# Altium PCB Plytka_power.PcbDoc
Units mm, origin at the board's own origin, x right, y up, seen from the top; angles counter-clockwise.
Board outline 49 x 49 mm, 2 copper layers (Top Layer, Bottom Layer); 26 components, 17 nets, 71 pads, 50 vias.
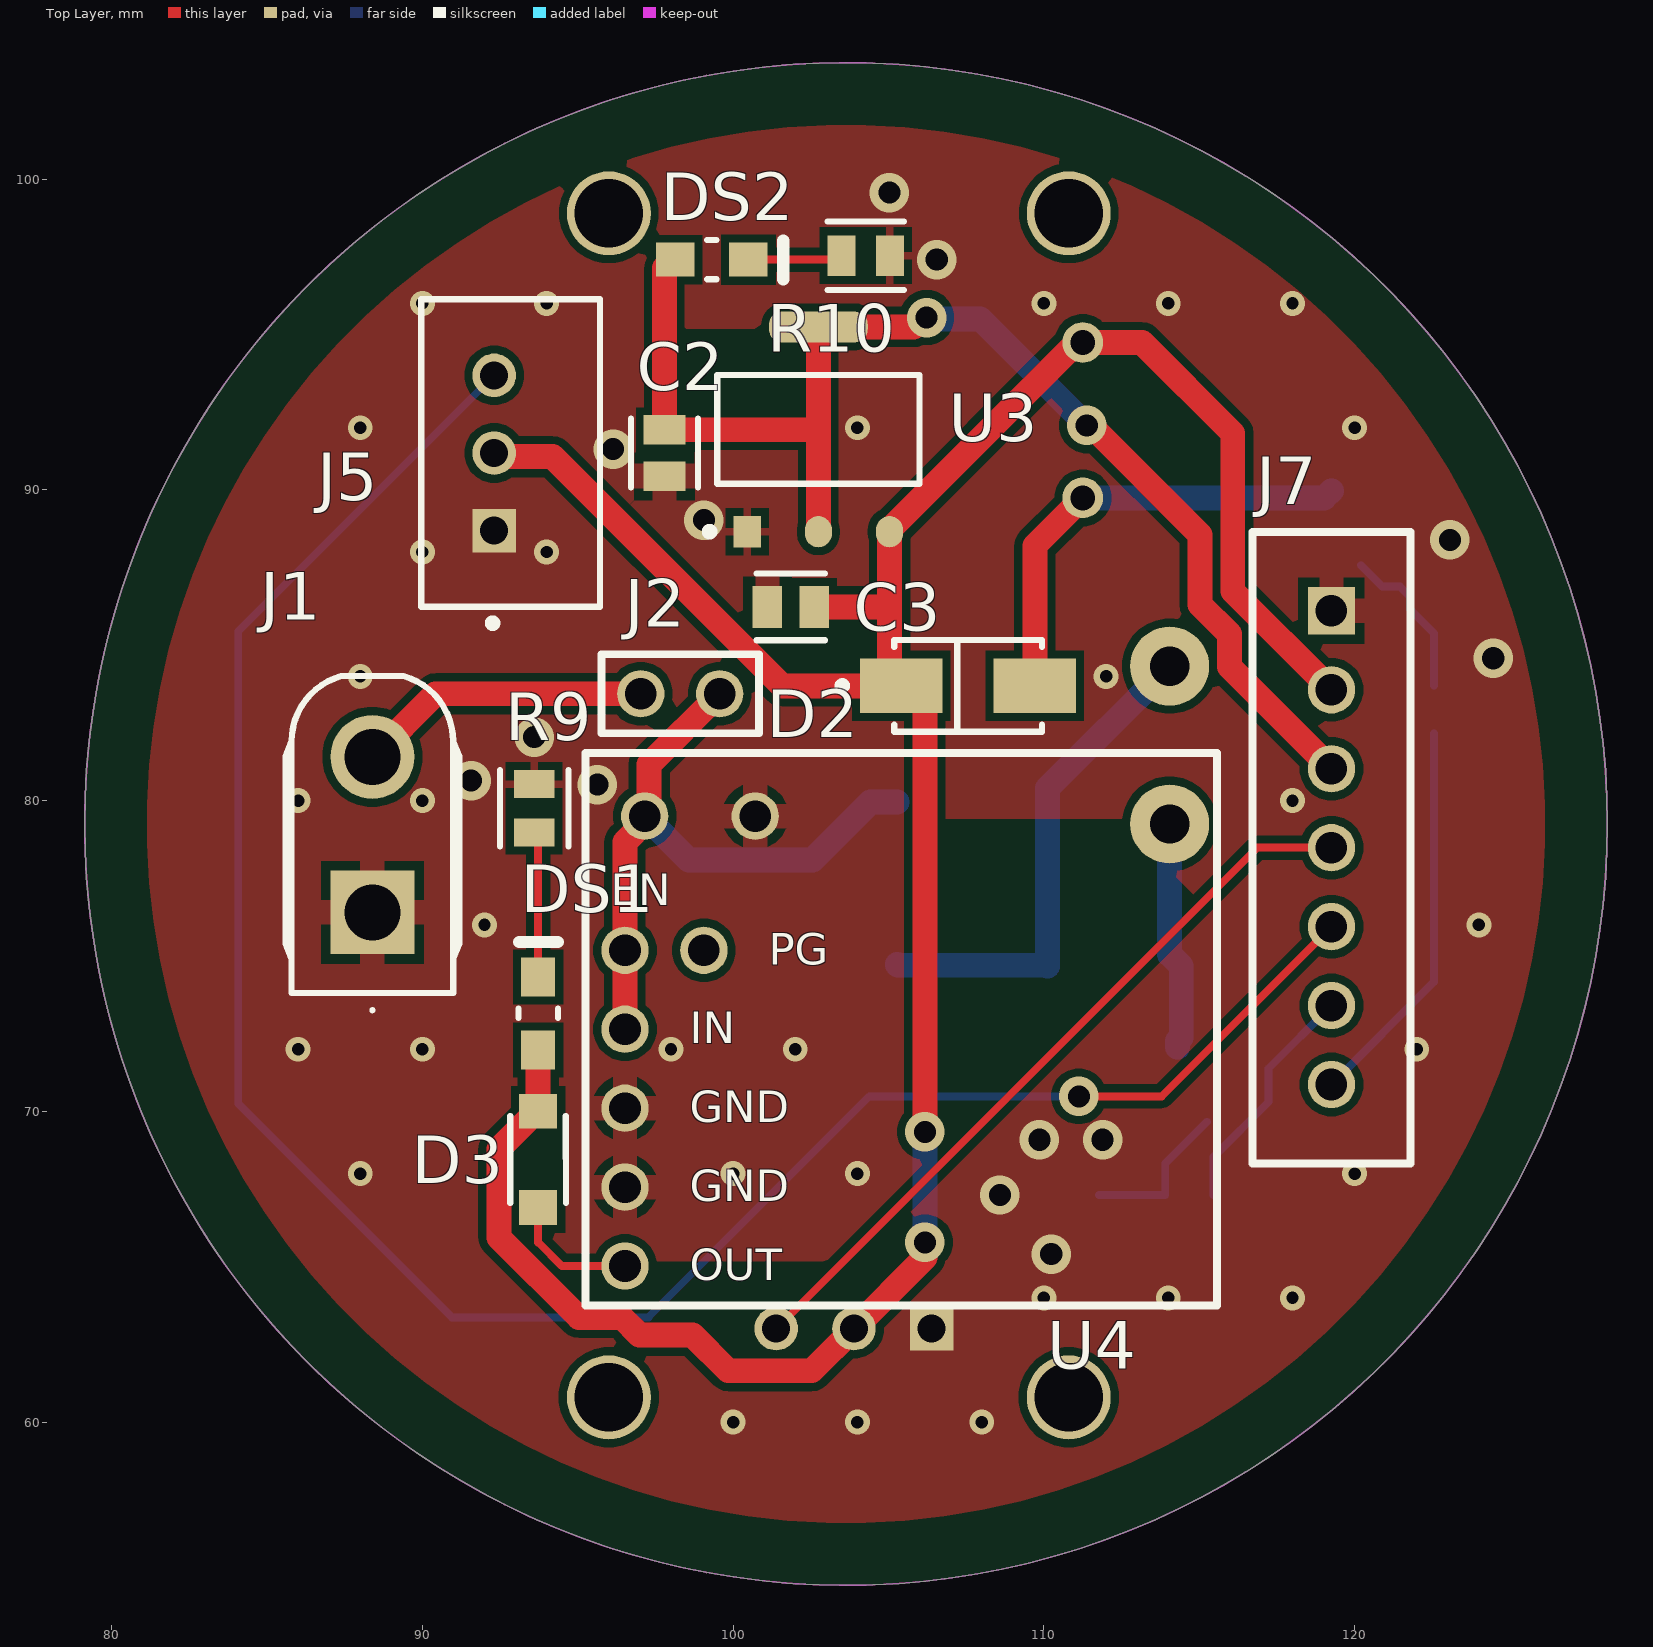
[diagram p0: Top Layer view]
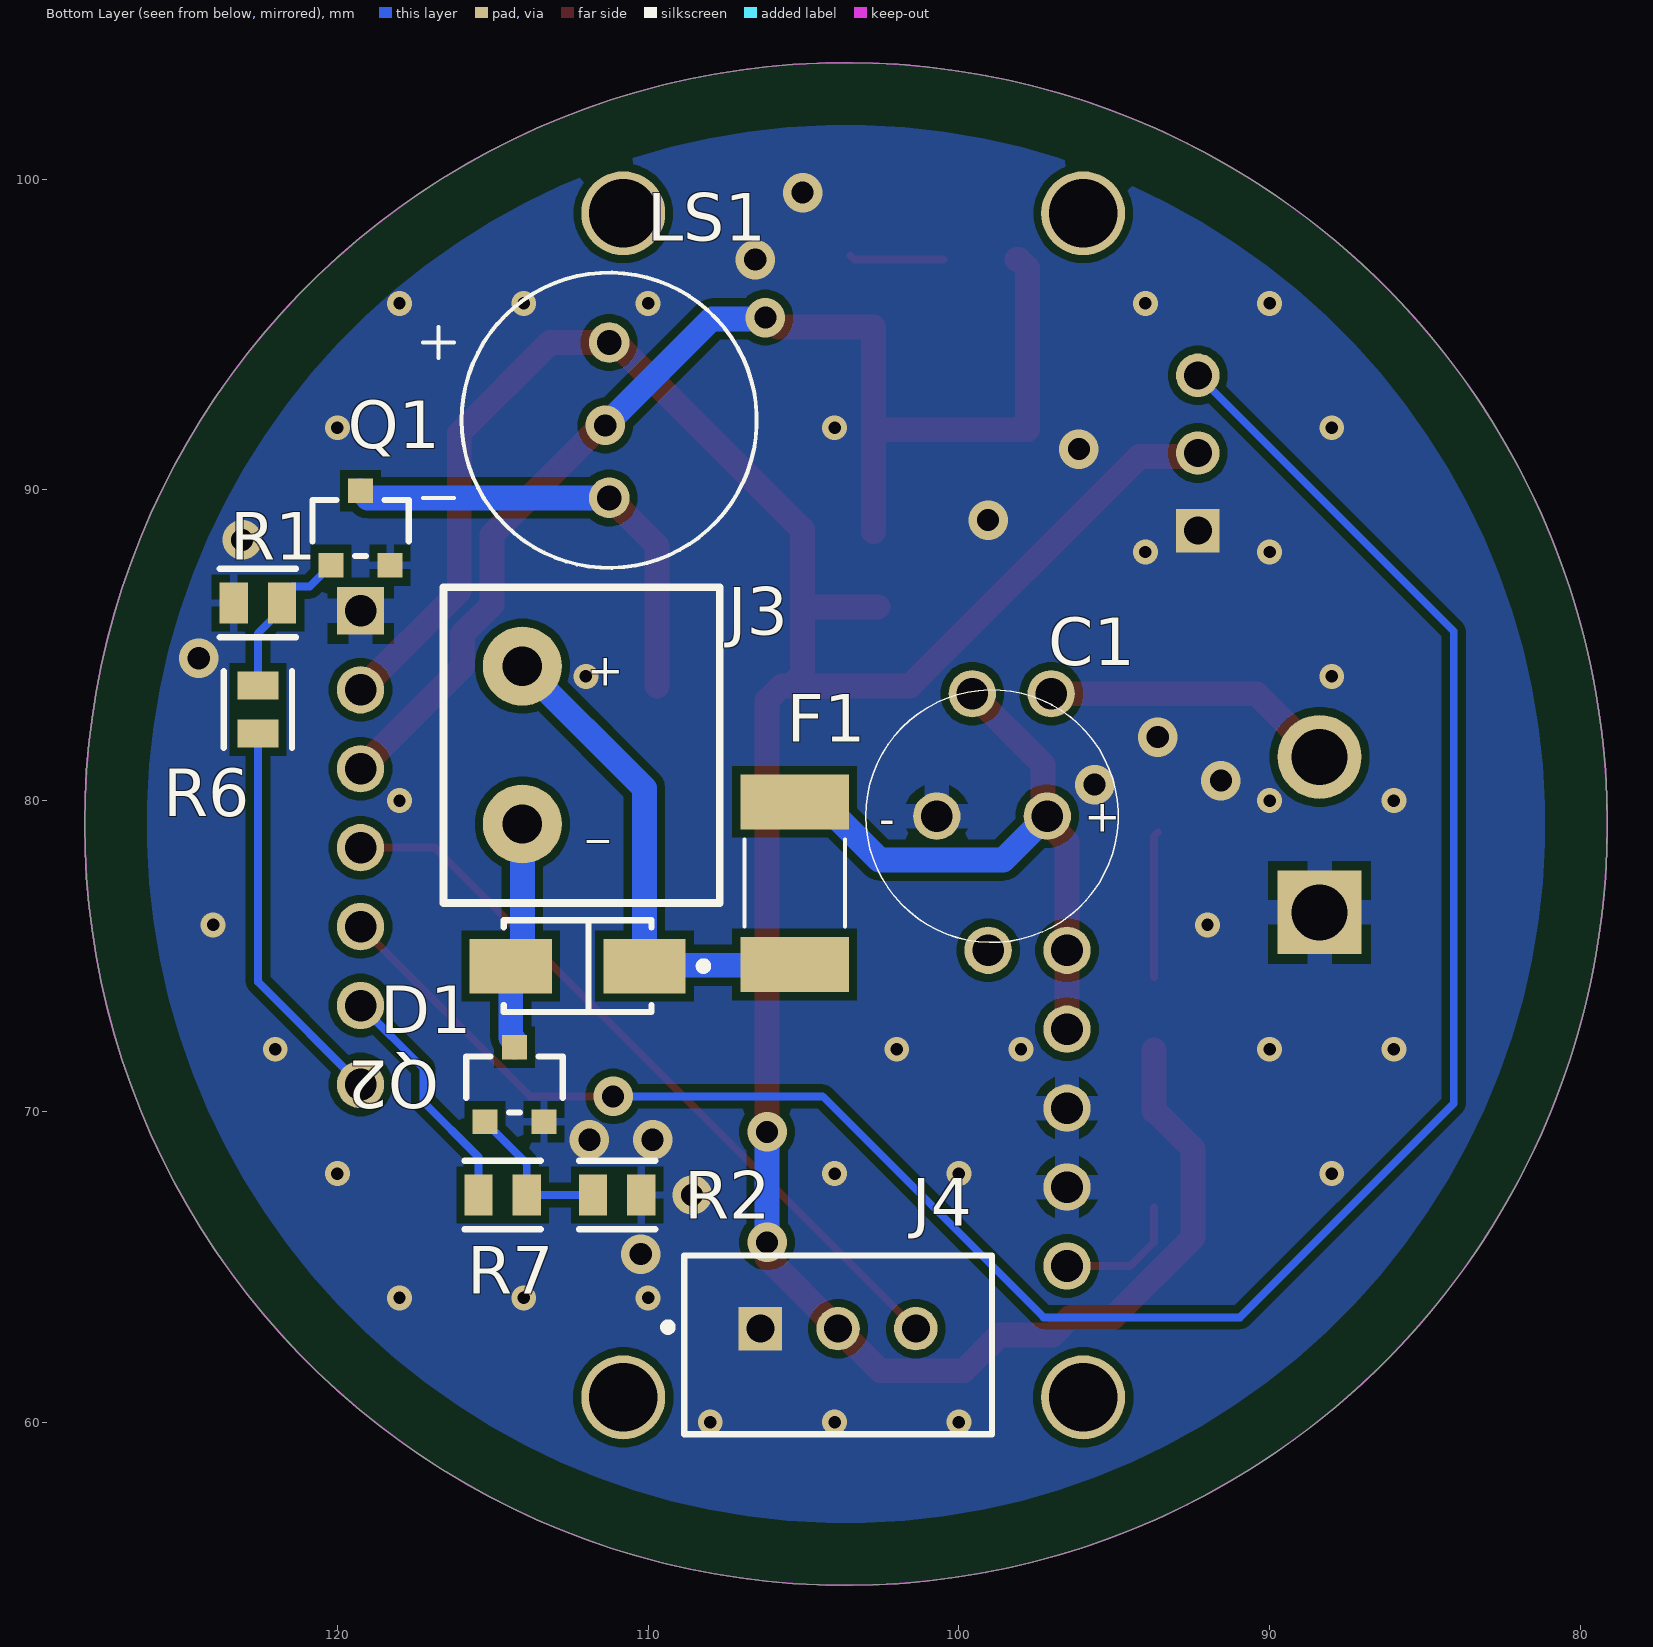
[diagram p1: Bottom Layer view, seen from below]
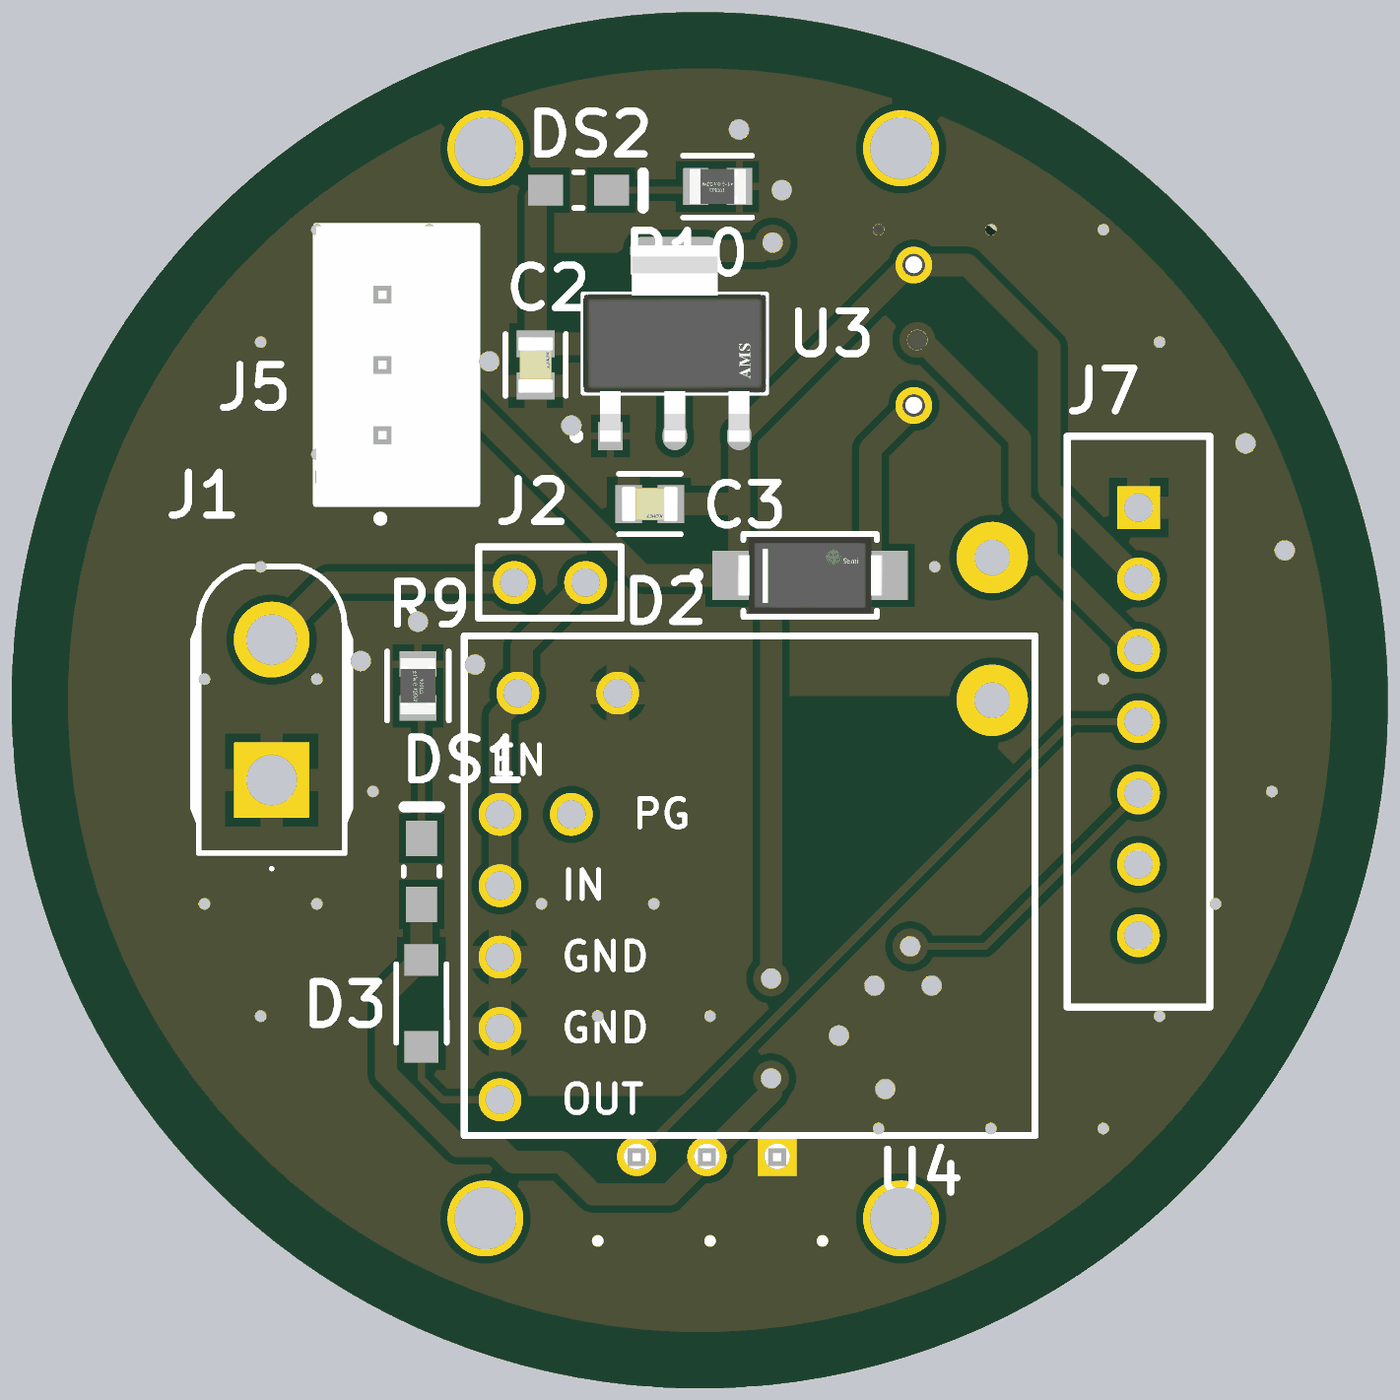
[diagram p2: 3D render of the assembled board from above, using the file's embedded part models]
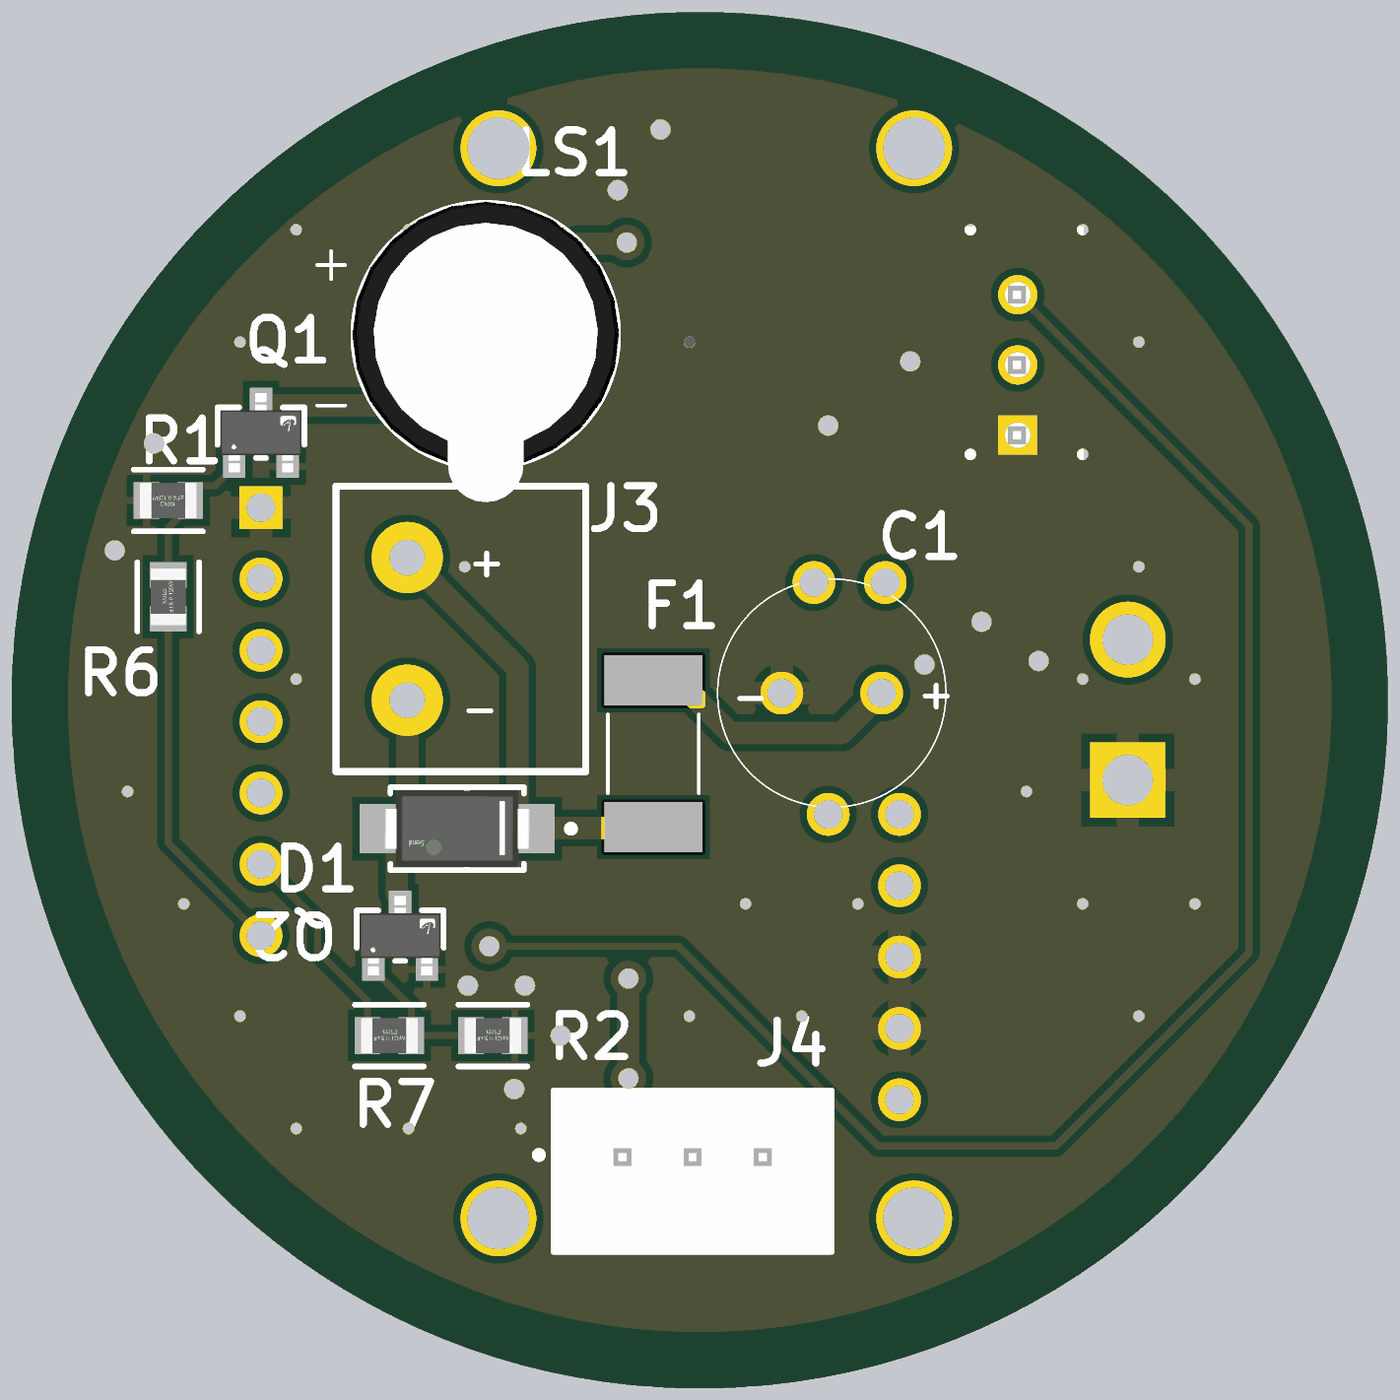
[diagram p3: 3D render of the assembled board from below, using the file's embedded part models]

## Layer stack, top to bottom
Top Solder: solder mask 0.0102, Solder Resist, Dk 3.5
Top Layer: signal copper 0.0356
Dielectric 1: dielectric 0.32, FR-4, Dk 4.8
Bottom Layer: signal copper 0.0356
Bottom Solder: solder mask 0.0102, Solder Resist, Dk 3.5

## Board outline
79.132,79.248 ccw(c103.632,79.248) 103.632,54.748 ccw(c103.632,79.248) 128.132,79.248 ccw(c103.632,79.248) 103.632,103.748 ccw(c103.632,79.248)

## Design rules (kind name [scope] priority, off if disabled: settings)
BoardOutlineClearance [All] p1: gap=2 ignorepadtopadclearanceinfootprint=FALSE except(0: Text-OutlineEdge Text-CavityEdge Text-CutoutEdge Text-SplitBarrior Text-SplitContinuation; 0.5: Arc-OutlineEdge Arc-CavityEdge Arc-CutoutEdge Arc-SplitBarrior Arc-SplitContinuation Track-OutlineEdge Track-CavityEdge Track-CutoutEdge Track-SplitBarrior Track-SplitContinuation)
Clearance [All] p1: gap=0.254 ignorepadtopadclearanceinfootprint=FALSE
PolygonConnect DirectConnect_Serwa [(InComponent('J5') or InComponent('J4')) and InNet('GND')] p1: connectstyle=Direct reliefconductorwidth=0.254 reliefentries=4 polygonreliefangle="90 Angle" airgapwidth=0.254
PolygonConnect PolygonConnect_J1 [All vs InComponent('J1') or InComponent('U4') or InComponent('J4') or InComponent('J5') or InComponent('C1') or InComponent('C2') or InComponent('C3') or InComponent('J7')] p2: connectstyle=Relief reliefconductorwidth=0.8 reliefentries=4 polygonreliefangle="90 Angle" airgapwidth=0.3
PolygonConnect Relief_U4_Przetwornica [InComponent('U4') and InNet('GND')] p3: connectstyle=Relief reliefconductorwidth=0.6 reliefentries=4 polygonreliefangle="90 Angle" airgapwidth=0.254
PolygonConnect [All] p4: thpad.connectstyle=Relief thpad.reliefconductorwidth=0.254 thpad.reliefentries=4 thpad.polygonreliefangle="90 Angle" thpad.airgapwidth=0.254 smdpad.connectstyle=Relief smdpad.reliefconductorwidth=0.254 smdpad.reliefentries=4 smdpad.polygonreliefangle="90 Angle" smdpad.airgapwidth=0.254 via.connectstyle=Direct via.reliefconductorwidth=0.254 via.reliefentries=4 via.polygonreliefangle="90 Angle" via.airgapwidth=0.254
RoutingVias [All] p1: holewidth=0.4 width=0.8 viastyle="Through Hole" minholewidth=0.2 minwidth=0.45 maxholewidth=0.8 maxwidth=1.5
SolderMaskExpansion SolderMask_Vias_Tented [IsVia] p1: expansion=0 istentingtop=TRUE
SolderMaskExpansion SolderMaskExpansion_1 [All] p2: expansion=0 istentingtop=FALSE
SupplyNets "Schematic Supply Nets" [InNet('GND')] p1: voltage=0.000
Width [InNet('VCC') or InNet('+5V') or InNet('+3.3V') or InNet('NetJ1_2') or InNet('NetD1_2') or InNet('NetJ3_1') or InNet('NetD1_1') or InNet('NetD2_1')] p1: maxlimit=1.2 minlimit=0.6 preferedwidth=0.8
Width Width_1 [All] p2: maxlimit=0.5 minlimit=0.2 preferedwidth=0.3
30 further rules are at their usual default settings.

## Components (designator, comment, footprint, x,y, rotation, side; value= is the part's Value field where it differs from the comment)
C1 "Kondensator_470uF/25V" Capacitor_470uF/25V 98.933,79.502 r180 bottom
C2 "10uF" FP-C0805C-DN-MFG 97.79,91.186 r270 top value=10μF
C3 "10uF" FP-C0805C-DN-MFG 101.854,86.233 r180 top value=10μF
D1 "SS14" FP-403AE-MFG 112.268,74.676 r180 bottom
D2 "SS14" FP-403AE-MFG 107.56,83.693 r180 top
D3 "SS34FA" SODFL3618X143N 93.726,68.453 r270 top
DS1 "KP-2012SGC" KING-KP-2012SGC_V 93.726,73.152 r90 top
DS2 "KP-2012SGC" KING-KP-2012SGC_V 99.314,97.409 r0 top
F1 "0ZCG0260BF2B" FUSER_0ZCG0260BF2B 105.283,77.343 r90 bottom
J1 "XT30PB-M" XT30PBM 88.392,76.407 r180 top
J2 "Zworka" Zworka 95.758,82.169 r0 top
J3 "ARK_10A_300V" ARK_10A_300V 116.586,76.708 r180 bottom
J4 "B3B-XH-A(LF)(SN)" FP-B3B-XH-A_LF_SN-MFG 103.886,62.484 r180 bottom
J5 "B3B-XH-A(LF)(SN)" FP-B3B-XH-A_LF_SN-MFG 92.837,91.186 r90 top
J7 "PrzejscieTHT" PrzejscieTHT 116.713,68.326 r0 top
LS1 "LEB9055B-05B-2.7-5.0-R" XDCR_AI-1027-TWT-3V-R 111.252,92.242 r180 bottom
Q1 "AO3400A" FP-SOT23-MFG 119.253,88.773 r90 bottom
Q2 "AO3400A" FP-SOT23-MFG 114.3,70.866 r90 bottom
R1 "10kΩ" FP-CRGCQ0805-IPC_C 122.555,86.36 r0 bottom value=10KΩ
R2 "10kΩ" FP-CRGCQ0805-IPC_C 110.998,67.31 r180 bottom value=10KΩ
R6 "100Ω" FP-CRGCQ0805-IPC_C 122.555,82.931 r90 bottom
R7 "100Ω" FP-CRGCQ0805-IPC_C 114.681,67.31 r180 bottom
R9 "1kΩ" FP-CRGCQ0805-IPC_C 93.599,79.756 r270 top value=10KΩ
R10 "1kΩ" FP-CRGCQ0805-IPC_C 104.267,97.536 r180 top value=10KΩ
U3 "ams1117" FP-ams1117-IPC_C 102.743,91.948 r90 top
U4 "D30V30F5" D30V30F5 95.25,63.754 r0 top

## Footprints (in the part's own frame and the unit in brackets; to place one, negate y for a bottom-side part, rotate by r counter-clockwise, add the part's x,y. Pads: shape width x height; smd on the part's side, far side on the other; paste and mask are expansions set on the pad)
ARK_10A_300V [mm]
  round 2.54 hole 1.27: 1(2.54,7.62) 2(2.54,2.54)
  silkscreen extent 0,0 8.89,10.16
Capacitor_470uF/25V [mil]
  round 60 hole 40: 1(70,0) 2(-70,0)
  silkscreen extent -160,-160 160,160
D30V30F5 [mil]
  round 60 hole 40: 1(50,50) 2(50,150) 3(50,250) 4(50,350) 5(50,450) 6(150,450)
  silkscreen extent 0,0 800,700
FP-403AE-MFG [mm]
  rect 2.65x1.75 smd paste+0 mask+0: 1(-2.15,0) 2(2.15,0)
  silkscreen extent -2.37,-1.48 4.17,1.48, body extent -2.6,-1.36 2.6,1.36, height 2.5
FP-ams1117-IPC_C [mm]
  rect 1.004x0.872 smd paste+0 mask+0: 1(-3.295,2.29)
  rrect100% 1.004x0.872 smd paste+0 mask+0: 2(-3.295,0) 3(-3.295,-2.29)
  rrect87% 1.004x3.182 smd paste+0 mask+0: 4(3.295,0)
  silkscreen extent -3.42,-3.25 1.75,3.62, body extent -3.9,-3.35 3.9,3.35, height 0.25
FP-B3B-XH-A_LF_SN-MFG [mm]
  rect 1.4x1.4 hole 0.9 paste-2539.97 mask+0: 1(-2.5,0.525)
  round 1.4 hole 0.9 paste-2539.97 mask+0: 2(0,0.525) 3(2.5,0.525)
  silkscreen extent -5.6,-2.88 4.95,2.88, body extent -4.95,-2.88 4.95,2.89, height 7
FP-C0805C-DN-MFG [mm]
  rect 0.95x1.35 smd paste+0 mask+0: 1(-0.75,0) 2(0.75,0)
  silkscreen extent -1.1,-1.07 1.1,1.07, body extent -1.4,-0.85 1.4,0.85, height 0.25
FP-CRGCQ0805-IPC_C [mm]
  rect 0.906x1.31 smd paste+0 mask+0: 1(-0.776,0) 2(0.776,0)
  silkscreen extent -1.23,-1.1 1.23,1.1, body extent -1,-0.63 1,0.63, height 0.65
FP-SOT23-MFG [mm]
  rect 0.8x0.8 smd paste+0 mask+0: 1(-1.2,0.95) 2(-1.2,-0.95) 3(1.2,0)
  silkscreen extent -0.9,-1.55 0.9,1.55, body extent -1.41,-1.45 1.41,1.45, height 1.25
FUSER_0ZCG0260BF2B [mm]
  rect 1.78x3.5 smd paste+0 mask+0.102: 1(-2.615,0) 2(2.615,0)
  silkscreen extent -1.4,-1.62 1.4,1.62
KING-KP-2012SGC_V [mm] "SMD, 2-Leads, Body 2x1.25mm"
  rect 1.25x1.1 smd: 1(-1.175,0) 2(1.175,0)
  silkscreen extent -0.15,-0.64 2.3,0.64, body extent -1,-0.63 1,0.63, height 1.1
PrzejscieTHT [mil]
  rect 60x60 hole 40: 1(100,700)
  round 60 hole 40: 2(100,600) 3(100,500) 4(100,400) 5(100,300) 6(100,200) 7(100,100)
  silkscreen extent 0,0 200,800
SODFL3618X143N [mm]
  rect 1.12x1.22 smd: 1(-1.55,0) 2(1.55,0)
  silkscreen extent -1.4,-0.9 1.4,0.9
XDCR_AI-1027-TWT-3V-R [mm]
  round 1.308 hole 0.8: N(0,-2.5) P(0,2.5)
  silkscreen extent -6,-4.75 4.75,4.75, body extent -4.75,-5.93 4.75,4.76, height 5.23
XT30PBM [mm]
  rect 2.7x2.7 hole 1.8: 1(0,0)
  round 2.7 hole 1.8: 2(0,-5)
  silkscreen extent -2.8,-7.6 2.8,3.2
Zworka [mil]
  round 60 hole 40: 1(50,50) 2(150,50)
  silkscreen extent 0,0 200,100

## Part data
C2 C3: library part CMP-2007-00274-2, "CAP CER 10UF 16V X7R 0805", Capacitance=10μF, Manufacturer=KEMET, Manufacturer Part Number=C0805C104K4RACTU, Package=C0805C-DN, Temperature="-55°C to +125°C", Temperature Characteristic=X7R, Temperature Coefficient=30ppm/°C, Temperature Range High=+125°C, Temperature Range Low=-55°C, Tolerance=0.1, Voltage Rating="16 V", Automotive=No, Category=Cap, ComponentLink2Description=Datasheet, ComponentLink2URL=https://content.kemet.com/datasheets/KEM_C1003_C0G_SMD.pdf, Device Class L1="Passive Components", Device Class L2=Capacitors, Device Class L3="Ceramic Capacitors", Digikey Description="CAP CER 0.1UF 16V X7R 0805", Height=0.88mm, Ipc Land Pattern Name=CAPC200125X78, Lead Free=Yes, Material=Ceramic, Mouser Description="Multilayer Ceramic Capacitors MLCC - SMD/SMT 16volts 0.1uF X7R 10%", Octopart=https://octopart.com/c0805c104k4ractu-kemet-92155, RoHS=TRUE
D1 D2: library part CMP-2000-04943-2, "DIODE SCHOTTKY 40V 1A SMA", Forward Current=1A, Manufacturer="ON Semiconductor", Max Junction Temp=+125°C, Max Repetitive Reverse Voltage=40V, Max Surge Forward Current=40A, Package=403AE, Peak Reverse Current=0.2mA, Temperature="-65°C to +125°C", Temperature Range Low=-65°C, Automotive=No, Category=Diode, ComponentLink2Description=Datasheet, ComponentLink2URL=https://www.onsemi.com/pub/Collateral/SS19-D.PDF, Device Class L1="Discrete Semiconductors", Device Class L2=Diodes, Device Class L3="Schottky Diodes", Digikey Description="DIODE SCHOTTKY 40V 1A SMA", Height=2.5mm, Lead Free=Yes, Manufacturer Part Number=SS14, Mouser Description="Schottky Diodes & Rectifiers SMA 40V 1.0A", Octopart=https://octopart.com/ss14-on+semiconductor-29205033, RoHS=TRUE, Standoff Height=0.05mm, Temperature Range High=+125°C
D3: "UL Flammability 94V-0 Classification; MSL 1 per J-STD-020; Low Power Loss, High Efficiency; Guard Ring for Overvoltage Protection; RoHS Compliant / Green Molding Compound; High Surge Current Capability; NRVB Prefix for Automotive and Other Applications Requiring Unique Site and Control Change Requirements; AECQ101 Qualified and PPAP Capable", Manufacturer_Name=onsemi, Mouser Part Number=512-SS34FA, Arrow Part Number=SS34FA, Arrow Price/Stock=https://www.arrow.com/en/products/ss34fa/on-semiconductor.html?utm_currency=USD&region=nac, Datasheet Link=https://www.onsemi.com/pub/Collateral/SS36FA-D.PDF, Geometry.Height=1.43mm, Manufacturer_Part_Number=SS34FA, Mouser Price/Stock=https://www.mouser.co.uk/ProductDetail/onsemi-Fairchild/SS34FA?qs=R26iFe%2FkX%2FK1QUwZdCmBBw%3D%3D
DS1 DS2: library part CMP-2000-06517-1, "LED Green, 62.5 mW, 25 mA, -40 to 85 degC, 4-Pin SMD, RoHS, Tape and Reel", Current If Luminous Intensity=20mA, Forward Voltage=2.2V, Forward Voltage VF Max=2.5V, LED Colour=Green, Manufacturer=Kingbright, Operating Temperature Max=85°C, Operating Temperature Min=-40°C, Operating Temperature Range=-40°Cto+85°C, Package Description="2-Pin Surface Mount Device, Body 2 x 1.25 mm", Peak Forward Current=30mA, Voltage Vf Typ=2.1V, Bulb Size=1.25mmx1.3mm, Datasheet URL=https://datasheet.ciiva.com/14176/kp2012sgc-eng-tds-14176961.pdf, Datasheet Version="Rev. 15, 09/2010", Dominant Wavelength=568nm, External Depth=1.25mm, External Length / Height=1.1mm, External Width=2.0mm, Forward Current If=20mA, Forward Current If Max=20mA, LED / Lamp Size=1.3mmx1.25mm, LED Mounting=SMD, LED Type=Standard, Lens Shape=Rectangular, Luminous Intensity=12mcd, Luminous Intensity @ If Min=4mcd, Luminous Intensity Typ=20mcd, Manufacturer URL=http://www.kingbright.com/, Material=GaP, Mounting Technology=SurfaceMount, Mounting Type=SMD, MSL=MSL3-168hours, No. of Pins=2, Package Reference=KP-2012SGC, Packaging=CutTape, Peak Wavelength=565nm, PIV Max=5V, SVHC=NoSVHC(16-Dec-2013), Viewing Angle=120°, Wavelength Typ=568nm
F1: Package=None, Availability=Unavailable, MF="{'manufacturer': u'Bel Fuse'}", MP=0ZCG0260BF2B, Price=None
J1: "Brass Gold Plated Connector 0.65m , 500VDC , 15A , -20 to 120", Manufacturer_Name=Amass, Datasheet Link=https://g.componentsearchengine.com/ga/Vtm2s6UR3EprZ4UN, Geometry.Height=10.7mm, Manufacturer_Part_Number=XT30PB-M
J4 J5: library part CMP-17439-000014-3, "CONN HEADER VERT 3POS 2.5MM", Color=Natural, Contact Resistance=20mR, Current Rating=3A, Flammability Rating="UL94 V-0", Housing Color=White, Insulation Resistance=1GR, Max Operating Temperature=85°C, Max Voltage Rating (AC)=250V, Min Operating Temperature=-25°C, Connector Type=Header, Contact Finish - Mating=TIN, Contact Material=Brass, Contact Plating=Tin, Contact Shape=Square, Contact Type="Male Pin", Depth=5.75mm, Fastening Type=Detent, Gender=Male, Housing Material=Polyamide, Insulation Color=Natural, Insulation Material=Nylon, Lead Free="Lead Free", Lead Pitch=2.5mm, Length=9.9mm, Max Current Rating=3A, Max Voltage Rating (DC)=250V, Mount="Through Hole", Number of Contacts=3, Number of Positions=3, Number of Rows=1, Orientation=Straight, Packaging=Bulk, Pitch=2.5mm, REACH SVHC="No SVHC", Series=XH, Termination=Solder, Voltage Rating=250V, Voltage Rating (AC)=250V, Wire/Cable Gauge=22AWG
LS1: library part AI-1027-TWT-3V-R, "AUDIO INDICATOR 3VDC 30MA 80DBA 2700HZ", Package=None, Check_prices=https://www.snapeda.com/parts/AI-1027-TWT-3V-R/PUI+Audio%252C+Inc./view-part/?ref=eda, MF="PUI Audio", MP=AI-1027-TWT-3V-R, SnapEDA_Link=https://www.snapeda.com/parts/AI-1027-TWT-3V-R/PUI+Audio%252C+Inc./view-part/?ref=snap
Q1 Q2: library part CMP-83955-000006-1, "MOSFET N-CH 30V 5.7A SOT23", Case/Package=SOT-23, Continuous Drain Current (ID)=5.7A, Drain to Source Voltage (Vdss)=30V, Gate to Source Voltage (Vgs)=12V, Input Capacitance=630pF, Max Operating Temperature=150°C, Max Power Dissipation=1.4W, Min Operating Temperature=-55°C, Lead Free="Lead Free", Mount="Surface Mount", Number of Elements=1, Number of Pins=3, Packaging="Tape and Reel", Power Dissipation=1.4W, Radiation Hardening=No, Rds On Max=26.5mR
R1 R2: library part CMP-03211-002989-1, "CRGCQ 0805 10K 5%", Ambient Temperature Range High=+70°C, Manufacturer="TE Connectivity", Manufacturer Part Number=CRGCQ0805J10K, Package=CRGCQ0805, Power Rating=0.125W, Resistance=10KΩ, Temperature="-55°C to +155°C", Temperature Coefficient=±100ppm/°C, Temperature Range High=+155°C, Temperature Range Low=-55°C, Tolerance=0.05, Voltage Rating=150V, Automotive=Yes, Automotive Grade="Grade 914", Category=Res, ComponentLink2Description=Datasheet, ComponentLink2URL=https://www.te.com/commerce/DocumentDelivery/DDEController?Action=showdoc&DocId=Data+Sheet%7F1773204-3%7F1%7Fpdf%7FEnglish%7FENG_DS_1773204-3_1.pdf%7F4-2176341-923, Composition="Thick Film", Device Class L1="Passive Components", Device Class L2=Resistors, Device Class L3="Chip SMD Resistors", Digikey Description="CRGCQ 0805 10K 5%", Height=0.65mm, Ipc Land Pattern Name=RESC200125X55, Lead Free=Yes, Mouser Description="Res Thick Film 0805 10K Ohm 5% 0.125W(1/8W) ±100ppm/C Pad SMD Automotive T/R", Octopart=https://octopart.com/crgcq0805j10k-te+connectivity-91018201, RoHS=TRUE, Series=CRGCQ
R6 R7: library part CMP-03211-002989-1, "CRGCQ 0805 100 5%", Ambient Temperature Range High=+70°C, Manufacturer="TE Connectivity", Manufacturer Part Number=CRGCQ0805J10K, Package=CRGCQ0805, Power Rating=0.125W, Temperature="-55°C to +155°C", Temperature Coefficient=±100ppm/°C, Temperature Range High=+155°C, Temperature Range Low=-55°C, Tolerance=0.05, Voltage Rating=150V, Automotive=Yes, Automotive Grade="Grade 914", Category=Res, ComponentLink2Description=Datasheet, ComponentLink2URL=https://www.te.com/commerce/DocumentDelivery/DDEController?Action=showdoc&DocId=Data+Sheet%7F1773204-3%7F1%7Fpdf%7FEnglish%7FENG_DS_1773204-3_1.pdf%7F4-2176341-923, Composition="Thick Film", Device Class L1="Passive Components", Device Class L2=Resistors, Device Class L3="Chip SMD Resistors", Digikey Description="CRGCQ 0805 10K 5%", Height=0.65mm, Ipc Land Pattern Name=RESC200125X55, Lead Free=Yes, Mouser Description="Res Thick Film 0805 10K Ohm 5% 0.125W(1/8W) ±100ppm/C Pad SMD Automotive T/R", Octopart=https://octopart.com/crgcq0805j10k-te+connectivity-91018201, Resistance=100Ω, RoHS=TRUE, Series=CRGCQ
R9 R10: library part CMP-03211-002989-1, "CRGCQ 0805 1K 5%", Ambient Temperature Range High=+70°C, Manufacturer="TE Connectivity", Manufacturer Part Number=CRGCQ0805J10K, Package=CRGCQ0805, Power Rating=0.125W, Resistance=10KΩ, Temperature="-55°C to +155°C", Temperature Coefficient=±100ppm/°C, Temperature Range High=+155°C, Temperature Range Low=-55°C, Tolerance=0.05, Voltage Rating=150V, Automotive=Yes, Automotive Grade="Grade 914", Category=Res, ComponentLink2Description=Datasheet, ComponentLink2URL=https://www.te.com/commerce/DocumentDelivery/DDEController?Action=showdoc&DocId=Data+Sheet%7F1773204-3%7F1%7Fpdf%7FEnglish%7FENG_DS_1773204-3_1.pdf%7F4-2176341-923, Composition="Thick Film", Device Class L1="Passive Components", Device Class L2=Resistors, Device Class L3="Chip SMD Resistors", Digikey Description="CRGCQ 0805 10K 5%", Height=0.65mm, Ipc Land Pattern Name=RESC200125X55, Lead Free=Yes, Mouser Description="Res Thick Film 0805 10K Ohm 5% 0.125W(1/8W) ±100ppm/C Pad SMD Automotive T/R", Octopart=https://octopart.com/crgcq0805j10k-te+connectivity-91018201, RoHS=TRUE, Series=CRGCQ
U3: library part CMP-209535-000002-1, "1A LOW DROPOUT VOLTAGE REGULATOR", RoHS Compliant=Yes

## Free pads (board coordinates)
  round 2.7 hole 2.2 unplated: 49(110.8,98.9) 50(96,98.9) 51(96,60.8) 52(110.8,60.8)

## Via types
v1: diameter 0.8, hole 0.4, Top Layer to Bottom Layer, tented both sides, 32 vias
v2: diameter 1.27, hole 0.711, Top Layer to Bottom Layer, tented both sides, 18 vias

## Nets (pads, with @x,y where several pads share a name; then routed paths per layer and width w, separated by ;. In a path a pad name is that pad's centre, name@x,y a point inside that pad or via, vN(x,y) a via of type N, cw(c..) or ccw(c..) an arc to the next point about the centre after c; other vN are vias at no path point)
+3.3V: C2.1 DS2.1 J7.3 U3.2 U3.4 | length 41.8
  Top Layer w0.8: DS2.1 98.064,97.409 97.79,97.135 C2.1 102.731,91.936 102.743,91.948 ; U3.2 102.743,91.948 ; v2(106.228,95.543) 106.101,95.543 105.8,95.243 U3.4 102.743,91.948 ; v2(111.379,92.075) 111.506,92.075 115.024,88.557 115.024,86.304 115.97,85.358 115.97,84.309 J7.3
  Bottom Layer w0.8: v2(106.228,95.543) 106.267,95.504 107.95,95.504 v2(111.379,92.075)
+5V: C3.1 D2.2 D3.1 DS1.1 J4.2 J5.2 J7.2 LS1.P U3.3 | length 90.3
  Top Layer w0.8: J5.2 92.427,91.071 94.191,91.071 101.569,83.693 D2.2@105.033,83.693 ; DS1.1 D3.1 93.676,70.003 92.462,68.789 92.462,65.946 95.034,63.373 96.418,63.373 96.987,62.804 98.696,62.804 99.845,61.655 102.532,61.655 J4.2 106.172,65.295 v2(106.172,65.786) ; C3.1 104.904,86.233 105.033,86.362 ; v2(106.172,69.342) 106.172,83.218 105.697,83.693 D2.2 105.033,84.07 105.033,86.362 ; J7.2 116.078,86.741 116.078,91.821 113.157,94.742 LS1.P 111.155,94.645 110.959,94.645 105.033,88.719 U3.3 105.033,86.362
  Bottom Layer w0.8: v2(106.172,65.786) v2(106.172,69.342)
BUZZER: J7.7 R6.1 | length 12.7
  Bottom Layer w0.254: J7.7 122.555,74.168 R6.1
GND: C1.2 C2.2 C3.2 J1.1 J4.1 J5.1 J7.1 Q1.2 Q2.2 R1.2 R2.2 R9.1 R10.1 U3.1 U4.2 U4.3 | length 0.2
  Bottom Layer w0.254: v2(110.236,65.405) v2@110.236,65.532 ; v2(111.887,69.088) v2@111.991,69.088
  other v1: 100,60 104,60 108,60 110,64 114,64 118,64 88,68 100,68 104,68 120,68 86,72 90,72 98,72 102,72 122,72 92,76 124,76 86,80 90,80 118,80 88,84 112,84 90,88 94,88 88,92 104,92 120,92 90,96 94,96 110,96 114,96 118,96
  other v2: 108.585,67.31 109.855,69.088 95.631,80.518 91.567,80.645 93.599,82.042 124.46,84.582 123.063,88.392 99.06,89.027 96.139,91.313 106.553,97.409 105.029,99.568
NetD1_1: D1.1 J3.2 Q2.3 | length 7.4
  Bottom Layer w0.8: J3.2 114.046,75.048 D1.1 114.418,72.381 114.3,72.263 Q2.3
NetD1_2: D1.2 F1.1 J3.1 | length 16
  Bottom Layer w0.8: F1.1 105.309,74.702 D1.2@110.04,74.702 ; D1.2 110.118,80.4 J3.1
NetD2_1: D2.1 LS1.N Q1.3 | length 14.8
  Top Layer w0.8: D2.1 109.71,88.2 LS1.N
  Bottom Layer w0.8: LS1.N 119.022,89.742 Q1.3
NetD3_2: D3.2 U4.1 | length 4.2
  Top Layer w0.254: D3.2 93.726,65.786 94.488,65.024 U4.1
NetDS1_2: DS1.2 R9.2 | length 4.7
  Top Layer w0.254: R9.2 93.726,78.853 DS1.2
NetDS2_2: DS2.2 R10.2 | length 3.1
  Top Layer w0.254: DS2.2 103.364,97.409 R10.2
NetJ1_2: J1.2 J2.1 | length 9.5
  Top Layer w0.8: J1.2 90.424,83.439 J2.1
NetQ1_1: Q1.1 R1.1 R6.2 | length 5.2
  Bottom Layer w0.254: Q1.1 120.888,86.888 121.453,86.888 121.779,86.562 R1.1 121.779,86.158 122.555,85.382 R6.2
NetQ2_1: Q2.1 R2.1 R7.2 | length 5
  Bottom Layer w0.254: R2.1 R7.2 113.905,68.321 Q2.1
Serwo_PWM1: J4.3 J7.4 | length 24.3
  Top Layer w0.254: J4.3 116.863,78.486 J7.4
Serwo_PWM2: J5.3 J7.5 | length 70.1
  Top Layer w0.254: v2(111.125,70.485) 113.792,70.485 J7.5
  Bottom Layer w0.254: J5.3 84.074,85.448 84.074,70.253 90.954,63.373 97.272,63.373 104.384,70.485 v2(111.125,70.485)
VCC: C1.1 F1.2 J2.2 U4.4 U4.5 | length 21.5
  Top Layer w0.8: U4.4 U4.5 96.52,78.671 97.155,79.306 C1.1 97.294,79.641 97.294,81.165 J2.2
  Bottom Layer w0.8: C1.1 98.571,78.086 102.551,78.086 104.423,79.958 F1.2
Zapalnik: J7.6 R7.1 | length 7.7
  Bottom Layer w0.254: R7.1 115.457,68.534 117.234,70.311 117.234,71.387 J7.6
pads on no net: U4.6

## Polygon pours and split planes (outlines as drawn)
GND on Top Layer "GND_L01_P000" (solid, remove dead copper, pour order 0): 79.132,79.248 ccw(c103.632,79.248) 103.632,54.748 ccw(c103.632,79.248) 128.132,79.248 ccw(c103.632,79.248) 103.632,103.748 ccw(c103.632,79.248)
GND on Bottom Layer "GND_L02_P001" (solid, remove dead copper, pour order 1): 79.132,79.248 ccw(c103.632,79.248) 103.632,54.748 ccw(c103.632,79.248) 128.132,79.248 ccw(c103.632,79.248) 103.632,103.748 ccw(c103.632,79.248)

## Keep-outs
Keep-Out Layer:
  circle w0.05: c103.632,79.248 r24.5

## Other copper
Top Layer:
  pour cut-out: 98.497,95.178 100.892,95.178 100.892,94.923 101.334,94.481 102.083,94.481 102.083,92.596 102.014,92.665 98.45,92.665 98.45,95.225
  pour cut-out: 94.59,67.717 94.59,69.189 93.795,69.189 93.122,68.516 93.122,67.717
  pour cut-out: 97.536,65.158 102.939,65.082 102.87,65.014 101.732,63.904 100.932,63.904 100.432,63.404 100.497,62.641 100.57,62.515 100.497,62.315 97.026,62.315 94.89,64.451 94.89,64.559 94.966,64.636 95.572,64.636 95.572,64.633 96.128,64.077 96.912,64.077 97.536,64.701 97.536,65.158 102.863,65.158 102.87,65.151
  pour cut-out: 112.522,79.398 106.83,79.398 106.807,79.375 106.832,79.35 106.832,69.721 107.139,69.414 107.26,69.414 114.808,76.962 114.196,77.574 114.196,77.724 113.415,77.724 112.522,78.617
  pour cut-out: 110.919,92.621 111.262,92.964 111.323,92.903 111.722,92.903 111.722,92.792 115.234,89.28 115.342,89.28 115.418,89.357 115.418,91.548 112.884,94.082 111.789,94.082 111.552,93.845 111.092,93.845 111.092,93.82 110.236,92.964 110.579,92.621

## Silkscreen, mask and mechanical layers (free items; w line width, h text height)
Mechanical 1:
  circle w0.05: c103.632,79.248 r22.5

## Text inside footprints (layer, text, board x,y; h text height)
C1: Bottom Overlay "-" at 102.565,78.918 h1.02; Bottom Overlay "+" at 95.961,79.003 h1.02
J3: Bottom Overlay "_" at 111.963,78.96 h1.02; Bottom Overlay "+" at 111.963,83.701 h1.02
U4: Top Overlay "OUT" at 98.603,64.567 h1.02; Top Overlay "GND" at 98.603,67.107 h1.02; Top Overlay "GND" at 98.603,69.647 h1.02; Top Overlay "IN" at 98.603,72.187 h1.02; Top Overlay "EN" at 96.063,76.632 h1.02; Top Overlay "PG" at 101.143,74.727 h1.02